# Altium PCB 48MHz1-4_TCXO.PcbDoc
Units mm, origin at the board's own origin, x right, y up, seen from the top; angles counter-clockwise.
Board outline 22.61 x 32.9 mm, 2 copper layers (Top Layer, Bottom Layer), stack 0.478 mm thick; 50 components, 24 nets, 162 pads, 215 vias.
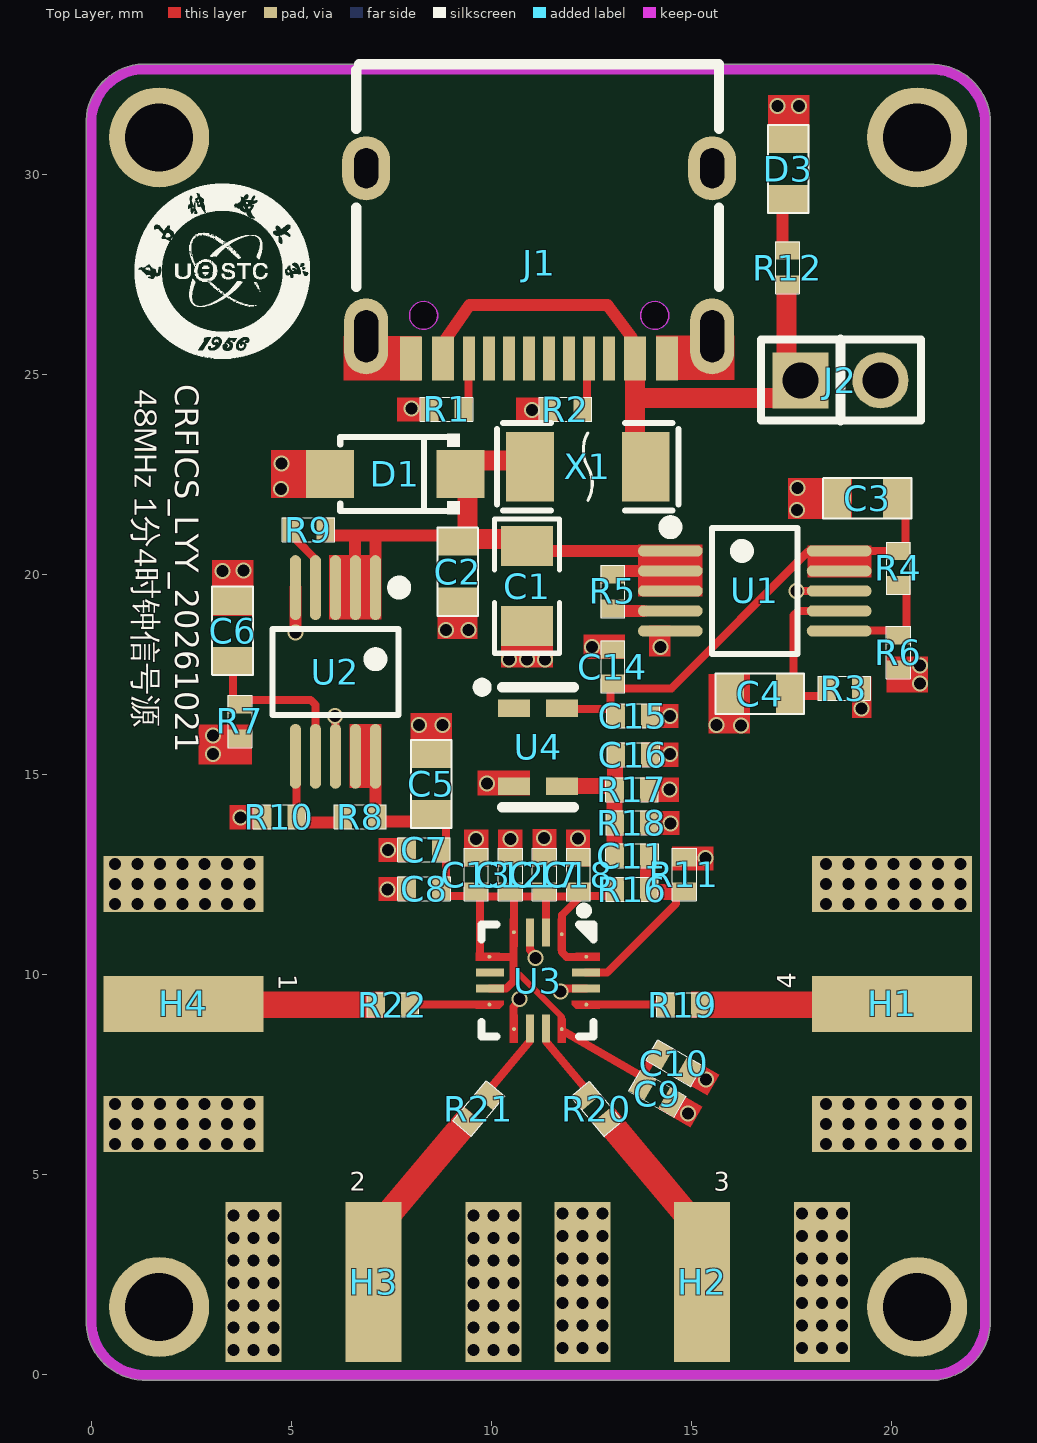
[diagram p0: Top Layer view]
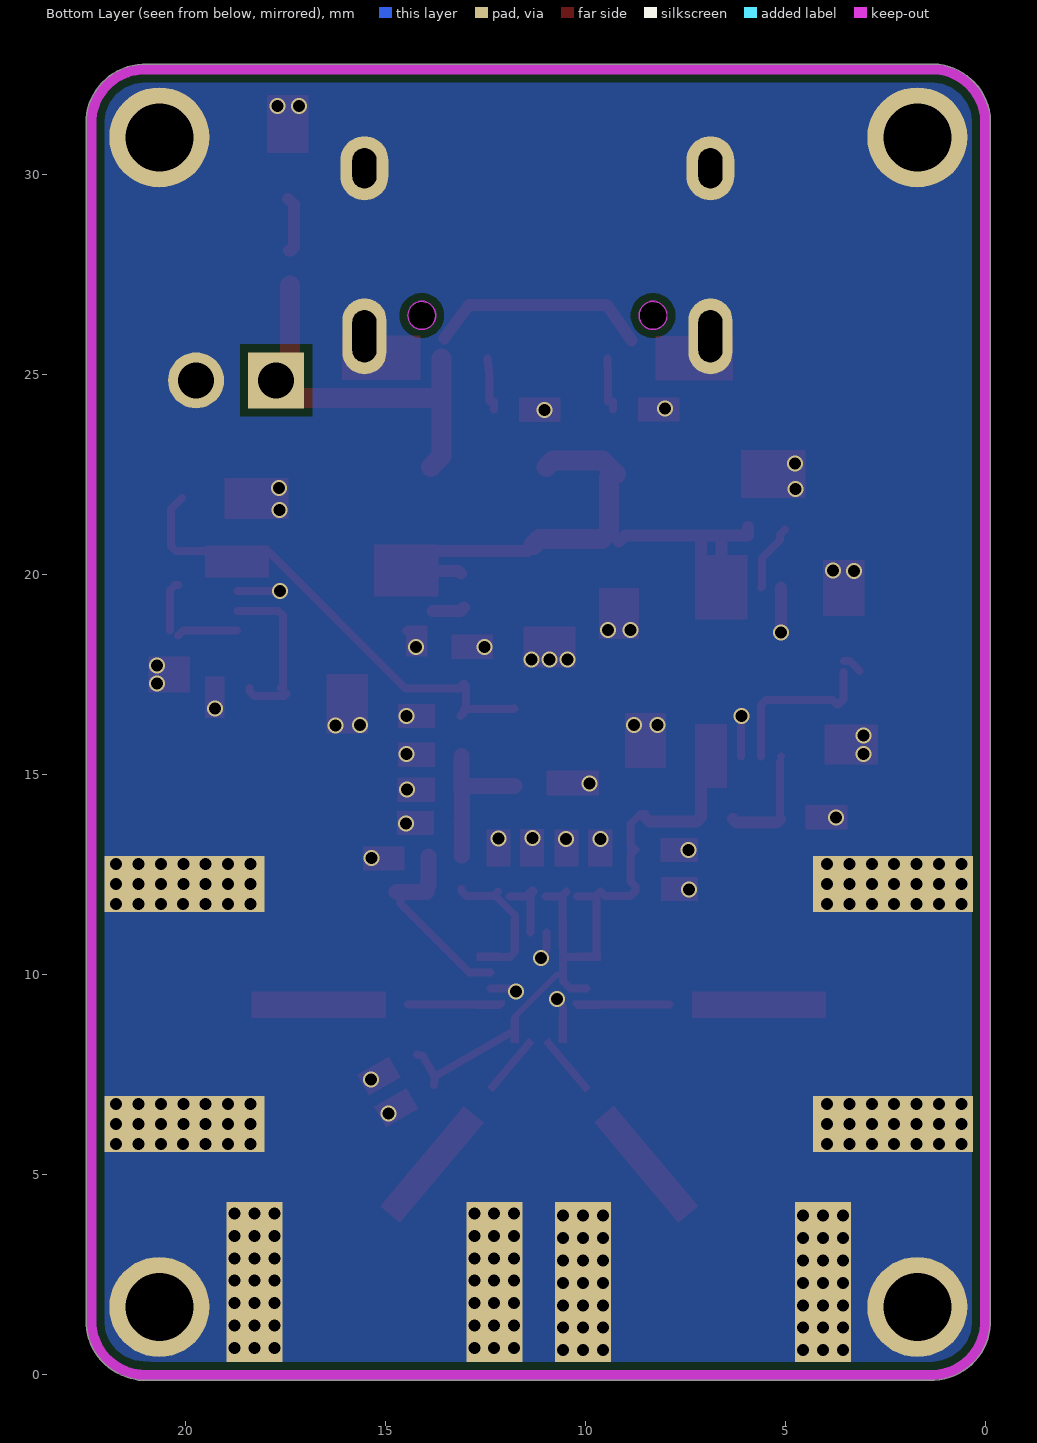
[diagram p1: Bottom Layer view, seen from below]

## Layer stack, top to bottom
Top Solder: solder mask 0.0102, Solder Resist, Dk 3.5
Top Layer: signal copper 0.0356
Dielectric 1: core 0.4064, Core-034, Dk 4.8
Bottom Layer: signal copper 0.0356
Bottom Solder: solder mask 0.0102, Solder Resist, Dk 3.5

## Board outline
1.273,-0.129 cw(c1.348,1.344) -0.127,1.399 -0.127,1.412 -0.127,31.345 -0.129,31.373 cw(c1.344,31.299) 1.419,32.773 1.452,32.766 21.047,32.766 21.08,32.769 cw(c21.006,31.296) 22.482,31.296 22.479,31.217 22.479,1.277 22.478,1.258 cw(c21.005,1.349) 21.246,-0.107 21.177,-0.127

## Design rules (kind name [scope] priority, off if disabled: settings)
Clearance Clearance_1 [InNamedPolygon('NONET_L-01_P-TOP')] p1: gap=0.58 ignorepadtopadclearanceinfootprint=FALSE except(0: Arc-Text Arc-Hole Track-Text Track-Hole SMDPad-Text SMDPad-Hole THPad-Text THPad-Hole Via-Text Via-Hole Fill-Text Fill-Hole Poly-Text Poly-Hole Region-Text Region-Hole Text-Text Text-Hole; 0.4: Arc-Arc Arc-Track Arc-SMDPad Arc-THPad Arc-Via Track-Track Track-SMDPad Track-THPad Track-Via SMDPad-SMDPad SMDPad-THPad SMDPad-Via THPad-THPad THPad-Via Via-Via; 0.7: Arc-Fill Arc-Poly Arc-Region Track-Fill Track-Poly Track-Region)
Clearance Clearance_2 [InNamedPolygon('NONET_L-01_P-002')] p2: gap=0.7 ignorepadtopadclearanceinfootprint=FALSE except(0: Arc-Hole Track-Hole SMDPad-Hole THPad-Hole Via-Hole Fill-Hole Poly-Hole Region-Hole Text-Hole; 0.3: Arc-Via Track-Via SMDPad-Via THPad-Via Via-Via)
Clearance GND_Bottom [InNamedPolygon('GND_Bottom')] p3: gap=0.6 ignorepadtopadclearanceinfootprint=TRUE
Clearance Ch341_3V3 [InNamedPolygon('CH341_3V3')] p4: gap=0.5 ignorepadtopadclearanceinfootprint=TRUE
Clearance VSS [InNamedPolygon('VSS')] p5: gap=0.2 ignorepadtopadclearanceinfootprint=TRUE except(0.6: Arc-Fill Arc-Poly Arc-Region Track-Fill Track-Poly Track-Region Fill-Fill Fill-Poly Fill-Region Poly-Poly Poly-Region Region-Region)
Clearance GND [InNamedPolygon('GND_Ploy')] p6: gap=0.4 ignorepadtopadclearanceinfootprint=TRUE except(0.8: Arc-Fill Arc-Poly Arc-Region Track-Fill Track-Poly Track-Region Fill-Fill Fill-Poly Fill-Region Poly-Poly Poly-Region Region-Region)
Clearance DC_GND [InNamedPolygon('DC_Ploy')] p7: gap=0.4 ignorepadtopadclearanceinfootprint=TRUE except(0.8: Arc-Fill Arc-Poly Arc-Region Track-Fill Track-Poly Track-Region Fill-Fill Fill-Poly Fill-Region Poly-Poly Poly-Region Region-Region)
Clearance LNA [InNamedPolygon('LNA')] p8: gap=0.102 ignorepadtopadclearanceinfootprint=TRUE except(0.2: Arc-Arc Arc-Track Track-Track SMDPad-Fill SMDPad-Poly SMDPad-Region THPad-Fill THPad-Poly THPad-Region; 0.8: Arc-Fill Arc-Poly Arc-Region Track-Fill Track-Poly Track-Region Via-Fill Via-Poly Via-Region Fill-Fill Fill-Poly Fill-Region Poly-Poly Poly-Region Region-Region)
Clearance Ploy [InPolygon] p9: gap=0.2 ignorepadtopadclearanceinfootprint=TRUE
Clearance Diff [InNetClass('Diff')] p10: gap=0.152 ignorepadtopadclearanceinfootprint=TRUE
Clearance [All] p11: gap=0.1 ignorepadtopadclearanceinfootprint=TRUE except(0.102: SMDPad-SMDPad; 0.203: SMDPad-THPad)
ComponentClearance [All] p1: gap=0.1 collisioncheckmode=3 verticalgap=0.1 showdistances=FALSE donotcheckwithout3dbody=TRUE
DiffPairsRouting [All] p1: maxlimit=10 minlimit=0.1 mostfreqgap=0.178 toplayer_minwidth=0.128 toplayer_maxwidth=1.016 toplayer_prefwidth=0.422 bottomlayer_minwidth=0.128 bottomlayer_maxwidth=1.016 bottomlayer_prefwidth=0.422 maxuncoupledlength=12.7
HoleSize [All] p1: absolutevalues=TRUE maxlimit=5 minlimit=0.025 maxpercent=80.000 minpercent=20.000
HoleToHoleClearance [All] p1: gap=0 allowstackedmicrovias=TRUE
MatchedLengths MatchedLengths_1 [InNetClass('class1')] p1: tolerance=25.4 checknetsindiffpair=FALSE checkdiffpairvsdiffpair=TRUE checkxsignals=TRUE checkothers=TRUE
MatchedLengths [InNetClass('DRM')] p2: tolerance=1.27 checknetsindiffpair=FALSE checkdiffpairvsdiffpair=TRUE checkxsignals=TRUE checkothers=TRUE
MinimumSolderMaskSliver [All] p1: minsoldermaskwidth=0
PlaneConnect [All] p1: planeconnectstyle=Direct reliefexpansion=0.508 reliefentries=4 reliefconductorwidth=0.254 reliefairgap=0.254
PolygonConnect [All] p1: connectstyle=Direct reliefconductorwidth=0.254 reliefentries=4 polygonreliefangle="90 Angle" airgapwidth=0.254
RoutingVias [All] p1: holewidth=0.711 width=1.27 viastyle="Through Hole" minholewidth=0.2 minwidth=0.1 maxholewidth=2.4 maxwidth=5
SilkToSilkClearance [All] p1: silktosilkclearance=0
SilkToSolderMaskClearance [IsPad] p1: minsilkscreentomaskgap=0 clearancetoexposedcopper=TRUE
SolderMaskExpansion [IsVia] p1: expansion=0.102 istentingtop=TRUE
SupplyNets "Schematic Supply Nets_1" [InNet('GND')] p1: voltage=0.000
SupplyNets "Schematic Supply Nets" [InNet('VDD')] p2: voltage=0.000
Width [All] p1: maxlimit=5 minlimit=0.1 preferedwidth=0.1 bottomlayer_maxwidth=0.254 minimp=50.000000 maximp=50.000000 favimp=50.000000
22 further rules are at their usual default settings.

## Classes and differential pairs
net class "New Class": NetH1_1 NetH2_1 NetH3_1 NetH4_1
net class class1: CLKOUT1 CLKOUT2 CLKOUT3 CLKOUT4
component class U_POWER: C1 C2 C3 C4 C5 C6 D1 D3 J1 J2 R1 R2 R3 R4 R5 R6 R7 R8 R9 R12 U1 U2 X1
component class U_48MHz_TCXO: C7 C8 C9 C10 C11 C12 C13 C14 C15 C16 C17 C18 H1 H2 H3 H4 m R12 R16 R17 R18 R19 R20 R21 R22 U3 U4

## Components (designator, comment, footprint, x,y, rotation, side; value= is the part's Value field where it differs from the comment)
C1 "47uF" 0805C 10.895,19.72 r90 top value="20pF  NP0"
C2 "10uF" 0603_Z 9.144,20.067 r270 top value="20pF  NP0"
C3 "4.7uF" 0603_Z 19.416,21.901 r0 top value="20pF  NP0"
C4 "4.7uF" 0603_Z 16.704,17.041 r180 top value="20pF  NP0"
C5 "4.7uF" 0603_Z 8.488,14.764 r270 top value="20pF  NP0"
C6 "4.7uF" 0603_Z 3.546,18.619 r90 top value="20pF  NP0"
C7 "1uF" 0402_Z 8.311,13.137 r0 top value="20pF  NP0"
C8 "10nF" 0402_Z 8.329,12.154 r180 top value="20pF  NP0"
C9 "10nF" 0402_Z 14.16,7.023 r150 top value="20pF  NP0"
C10 "1uF" 0402_Z 14.572,7.806 r330 top value="20pF  NP0"
C11 "100nF" 0402_Z 13.508,12.989 r0 top value="20pF  NP0"
C12 "10nF" 0402_Z 10.469,12.502 r90 top value="20pF  NP0"
C13 "1uF" 0402_Z 9.617,12.502 r90 top value="20pF  NP0"
C14 "10uF" 0402_Z 13.03,17.7 r90 top value="20pF  NP0"
C15 "100nF" 0402_Z 13.554,16.471 r180 top value="20pF  NP0"
C16 "10pF" 0402_Z 13.554,15.502 r180 top value="20pF  NP0"
C17 "10nF" 0402_Z 11.332,12.52 r270 top value="20pF  NP0"
C18 "1uF" 0402_Z 12.183,12.52 r270 top value="20pF  NP0"
D1 "SMF5.0A" SMF5.0A 7.602,22.524 r180 top
D3 "LED0" 0603_Z 17.414,30.14 r270 top
H1 "SMA" SMA-SMD 19.772,9.384 r180 top
H2 "SMA" SMA-SMD 15.166,2.077 r270 top
H3 "SMA" SMA-SMD 7.166,2.582 r90 top
H4 "SMA" SMA-SMD 2.558,9.168 r0 top
J1 "typec_16pin" TYPEC_16PIN 11.07,28.681 r180 top
J2 "2pin" H2-2mm 18.731,24.864 r0 top
R1 "5.1k" 0402_Z 8.876,24.145 r0 top
R2 "5.1k" 0402_Z 11.846,24.145 r0 top
R3 "33k" 0402_Z 18.826,17.164 r180 top
R4 "91k" 0402_Z 20.184,20.178 r270 top
R5 "200k" 0402_Z 13.03,19.579 r90 top
R6 "10k" 0402_Z 20.184,18.072 r270 top
R7 "33k" 0402_Z 3.703,16.33 r90 top
R8 "91k" 0402_Z 6.731,13.949 r180 top
R9 "200k" 0402_Z 5.42,21.139 r0 top
R10 "10k" 0402_Z 4.714,13.949 r180 top
R11 "10k" 0402_Z 14.814,12.502 r90 top
R12 "10k" 0402_Z 17.414,27.69 r270 top
R16 "10k" 0402_Z 13.51,12.154 r0 top
R17 "10k" 0402_Z 13.508,14.638 r0 top
R18 "50" 0402_Z 13.508,13.813 r0 top
R19 "33" 0402_Z 14.783,9.266 r0 top
R20 "33" 0402_Z 12.634,6.665 r310 top
R21 "33" 0402_Z 9.695,6.665 r230 top
R22 "33" 0402_Z 7.549,9.254 r180 top
U1 "IBSP3030ADJMS10R00" IBSP3030ADJMS10R00 16.588,19.601 r270 top
U2 "IBSP3030ADJMS10R00" IBSP3030ADJMS10R00 6.105,17.575 r180 top
U3 "5PB1214CMGK" 5PB1214CMGK 11.166,9.857 r270 top
U4 "YSO510TP" 48MH温补晶振 11.296,15.692 r270 top
X1 "Fuse" F1206 12.414,22.705 r0 top

## Footprints (in the part's own frame and the unit in brackets; to place one, negate y for a bottom-side part, rotate by r counter-clockwise, add the part's x,y. Pads: shape width x height; smd on the part's side, far side on the other; paste and mask are expansions set on the pad)
5PB1214CMGK [mm]
  round 0.098 smd: 1(-1.162,0.598) 4(-1.212,-0.598) 5(-0.598,-1.212) 8(0.598,-1.212) 9(1.212,-0.598) 12(1.212,0.598) 13(0.598,1.212) 16(-0.598,1.212)
  rect 0.7x0.2 smd mask+0.05: 2(-1.2,0.2) 3(-1.2,-0.2) 10(1.2,-0.2) 11(1.2,0.2)
  rect 0.2x0.7 smd mask+0.05: 6(-0.2,-1.2) 7(0.2,-1.2) 14(0.2,1.2) 15(-0.2,1.2)
  Top Layer region: 0.85,-0.5 1.55,-0.5 1.55,-0.7 1.05,-0.7 0.95,-0.7 0.85,-0.6 0.85,-0.5
  Top Layer region: 0.85,0.5 0.85,0.6 0.95,0.7 1.55,0.7 1.55,0.5 0.85,0.5
  Top Layer region: -0.85,-0.5 -0.85,-0.6 -0.95,-0.7 -1.55,-0.7 -1.55,-0.5 -0.85,-0.5
  Top Layer region: -0.75,0.5 -1.55,0.5 -1.55,0.7 -1.05,0.7 -0.85,0.7 -0.75,0.6 -0.75,0.5
  Top Layer region: 0.5,1.55 0.5,0.9 0.5,0.85 0.6,0.85 0.7,0.95 0.7,1.55 0.5,1.55
  Top Layer region: -0.5,-1.55 -0.5,-0.9 -0.5,-0.85 -0.6,-0.85 -0.7,-0.95 -0.7,-1.55 -0.5,-1.55
  Top Layer region: -0.5,1.55 -0.5,0.9 -0.5,0.85 -0.6,0.85 -0.7,0.95 -0.7,1.55 -0.5,1.55
  Top Layer region: 0.5,-1.55 0.5,-0.9 0.5,-0.85 0.6,-0.85 0.7,-0.95 0.7,-1.55 0.5,-1.55
  silkscreen extent -1.85,-1.4 1.4,1.4
48MH温补晶振 [mil] "YSO510TP 48MHZ 3.3V ±1.5PPM -30~85℃ (±0.5PPM) Clipped Sine Wave"
  rect 17.3x31.5 smd: 1(-38.4,-28.6) 2(38.4,-28.6) 3(38.4,18.7) 4(-38.4,18.7)
  silkscreen extent -64,-65 59,31
0402_Z [mm]
  rect 0.45x0.6 smd mask+0: 1(0.434,-0.006) 2(-0.416,-0.006)
  silkscreen extent -0.64,-0.31 0.66,0.29, body extent -0.41,-0.31 0.44,0.29, height 0.25
0603_Z [mm]
  rect 0.7x1 smd mask+0: 1(0.735,0.013) 2(-0.765,0.013)
  silkscreen extent -1.12,-0.49 1.09,0.52
0805C [mm]
  rect 1x1.3 smd: 1(-1,0) 2(1,0)
  silkscreen extent -1.68,-0.81 1.68,0.81
F1206 [mm] "保险丝"
  rect 1.19x1.728 smd paste+0 mask+0.051: 1(-1.445,0) 2(1.445,0)
  silkscreen extent -2.27,-1.09 2.27,1.09
H2-2mm [mm]
  rect 1.4x1.4 hole 0.9: 1(-1,0)
  round 1.4 hole 0.9: 2(1,0)
  silkscreen extent -1.99,-1 2.02,1.03
IBSP3030ADJMS10R00 [mm]
  oval 0.28x1.62 smd: 1(-1,-2.11) 2(-0.5,-2.11) 3(0,-2.11) 4(0.5,-2.11) 5(1,-2.11) 6(1,2.11) 7(0.5,2.11) 8(0,2.11) 9(-0.5,2.11) 10(-1,2.11)
  silkscreen extent -1.74,-2.26 1.58,1.07
SMA-SMD [mm]
  rect 4x1.4 smd mask+0: 1(-0.253,0.108) 2(-0.253,3.105) 2(-0.253,-2.889)
  rect 4x1.4 smd far side mask+0: 4(-0.253,3.105) 5(-0.253,-2.889)
SMF5.0A [mm]
  rect 1.2x1.2 smd: 1(-1.635,0) 2(1.635,0)
  silkscreen extent -1.6,-1 1.38,1
TYPEC_16PIN [mm]
  oval 1.2x1.6 hole 0.6 slot 1 at 90 deg paste-2539.97 mask+0.05: 13(-4.452,-1.486) 14(4.198,-1.486)
  oval 1.1x1.9 hole 0.6 slot 1.3 at 90 deg paste-2539.97 mask+0.05: 13(-4.452,2.714) 14(4.198,2.714)
  rect 0.55x1.1 smd paste+0 mask+0.05: A1B12(-3.327,3.264) A4B9(-2.527,3.264) B1A12(3.073,3.264) B4A9(2.273,3.264)
  rect 0.3x1.1 smd paste+0 mask+0.05: A5(-1.377,3.264) A6(-0.377,3.264) A7(0.123,3.264) A8(1.123,3.264) B5(1.623,3.264) B6(0.623,3.264) B7(-0.877,3.264) B8(-1.877,3.264)
  Keep-Out Layer board cut-out: 3.113,2.194 3.113,2.124 3.06,1.996 2.961,1.897 2.833,1.844 2.694,1.844 2.565,1.897 2.466,1.996 2.413,2.124 2.413,2.194 2.413,2.264 2.466,2.392 2.565,2.491 2.694,2.544 2.833,2.544 2.961,2.491 3.06,2.392 3.113,2.264 3.113,2.194 3.113,2.194
  Keep-Out Layer board cut-out: -2.667,2.194 -2.667,2.124 -2.72,1.996 -2.819,1.897 -2.947,1.844 -3.087,1.844 -3.215,1.897 -3.314,1.996 -3.367,2.124 -3.367,2.194 -3.367,2.264 -3.314,2.392 -3.215,2.491 -3.087,2.544 -2.947,2.544 -2.819,2.491 -2.72,2.392 -2.667,2.264 -2.667,2.194 -2.667,2.194
  Keep-Out Layer circle w0.003: c2.763,2.194 r0.35
  Keep-Out Layer circle w0.003: c-3.017,2.194 r0.35
  Keep-Out Layer region: 3.113,2.194 3.104,2.116 3.078,2.042 3.037,1.976 2.981,1.92 2.915,1.879 2.841,1.853 2.763,1.844 2.685,1.853 2.611,1.879 2.545,1.92 2.489,1.976 2.448,2.042 2.422,2.116 2.413,2.194 2.422,2.272 2.448,2.346 2.489,2.412 2.545,2.468 2.611,2.509 2.685,2.535 2.763,2.544 2.841,2.535 2.915,2.509 2.981,2.468 3.037,2.412 3.078,2.346 3.104,2.272 3.113,2.194
  Keep-Out Layer region: 3.113,2.194 3.113,2.124 3.06,1.996 2.961,1.897 2.833,1.844 2.694,1.844 2.565,1.897 2.466,1.996 2.413,2.124 2.413,2.194 2.413,2.264 2.466,2.392 2.565,2.491 2.694,2.544 2.833,2.544 2.961,2.491 3.06,2.392 3.113,2.264 3.113,2.194 3.113,2.194
  Keep-Out Layer region: -2.667,2.194 -2.676,2.116 -2.702,2.042 -2.743,1.976 -2.799,1.92 -2.865,1.879 -2.939,1.853 -3.017,1.844 -3.095,1.853 -3.169,1.879 -3.235,1.92 -3.291,1.976 -3.332,2.042 -3.358,2.116 -3.367,2.194 -3.358,2.272 -3.332,2.346 -3.291,2.412 -3.235,2.468 -3.169,2.509 -3.095,2.535 -3.017,2.544 -2.939,2.535 -2.865,2.509 -2.799,2.468 -2.743,2.412 -2.702,2.346 -2.676,2.272 -2.667,2.194
  Keep-Out Layer region: -2.667,2.194 -2.667,2.124 -2.72,1.996 -2.819,1.897 -2.947,1.844 -3.087,1.844 -3.215,1.897 -3.314,1.996 -3.367,2.124 -3.367,2.194 -3.367,2.264 -3.314,2.392 -3.215,2.491 -3.087,2.544 -2.947,2.544 -2.819,2.491 -2.72,2.392 -2.667,2.264 -2.667,2.194 -2.667,2.194
  silkscreen extent -4.63,-4.09 4.45,1.49

## Part data
C1: library part CAP, "0805"
C2 C14: library part CAP, "0603"
C3 C4 C5 C6 C7 C8 C9 C10 C11 C12 C13 C15 C16 C17 C18: library part CAP, "0402"
D3: "Typical INFRARED GaAs LED", LatestRevisionDate=08-Jul-2005, LatestRevisionNote="Mech Layer 1 removed.", PackageDescription="LED; 2 Leads", PackageReference=LED-0, Published=8-Jun-2000, Publisher="Altium Limited"
H1 H2 H3 H4: "BWSMA-KE-P001"
R1 R2 R3 R4 R5 R6 R7 R8 R9 R10 R11 R12 R16 R17 R18 R19 R20 R21 R22: library part Res3, "Resistor", LatestRevisionDate=04-Mar-2005, LatestRevisionNote="PCB Footprint replaced.", PackageReference=J1-0603, Published=8-Jun-2000, Publisher="Altium Limited"
U3: library part 5PB1214CMGK8
U4: library part 48MHz温补晶振, "48MHz温补晶振"
X1: CURRENT=1, RESISTANCE=1m, SimulationGenericComponent=True

## Free pads (board coordinates)
  round 2.5 hole 1.7 mask+0.102: ""(1.7,1.7) ""(1.7,30.94) ""(20.65,1.7) ""(20.65,30.94)

## Via types
v1: diameter 0.4, hole 0.3, Top Layer to Bottom Layer, 168 vias
v2: diameter 0.4, hole 0.3, Top Layer to Bottom Layer, tented both sides, 47 vias

## Nets (pads, with @x,y where several pads share a name; then routed paths per layer and width w, separated by ;. In a path a pad name is that pad's centre, name@x,y a point inside that pad or via, vN(x,y) a via of type N, cw(c..) or ccw(c..) an arc to the next point about the centre after c; other vN are vias at no path point)
CLKOUT1: R19.2 U3.13 | length 2.1
  Top Layer w0.2: U3.13 R19.2@14.439,9.26
CLKOUT2: R20.2 U3.11
CLKOUT3: R21.2 U3.10
CLKOUT4: R22.2 U3.8 | length 2.1
  Top Layer w0.2: R22.2@7.893,9.26 U3.8
GND: C1.1 C2.1 C3.2 C4.1 C5.2 C6.1 C7.2 C8.1 C9.2 C10.1 C12.1 C13.1 C14.1 C15.2 C16.2 C17.2 C18.2 D1.2 D3.2 H1.2 H1.4 H1.5 H2.2 H2.4 H2.5 H3.2 H3.4 H3.5 H4.2 H4.4 H4.5 J1.13 J1.14 J1.A1B12 J1.B1A12 J2.2 pad. R1.2 R2.2 R3.2 R6.1 R7.2 R10.1 R11.1 R17.1 R18.1 U1.5 U1.8 U2.5 U2.8 U3.3 U3.9 U3.14 U4.2 | length 5.9
  Top Layer w0.2: v2(6.1,16.474) 6.105,16.135 U2.8 ; U3.9@10.559,8.655 10.559,9.204 10.704,9.348 v2(10.704,9.402) ; U3.3 10.966,10.623 11.106,10.483 v2(11.106,10.429) ; v2(11.733,9.591) 11.787,9.591 11.854,9.657 U3.14 ; v2@14.224,18.288 14.224,18.601 U1.5 ; v2(17.635,19.595) 17.639,19.598 18.695,19.598 U1.8
  Top Layer w0.3: v2@5.08,18.542 v2(5.105,18.567) U2.5
  other v1: 3.561,0.622 4.061,0.622 9.555,0.622 10.055,0.622 4.56,0.623 10.554,0.623 11.778,0.676 12.277,0.677 12.777,0.677 17.772,0.676 18.271,0.677 18.771,0.677 3.561,1.182 4.061,1.182 4.56,1.183 9.555,1.182 10.055,1.182 10.554,1.183 11.778,1.236 12.277,1.237 12.777,1.237 17.772,1.236 18.271,1.237 18.771,1.237 3.561,1.742 4.061,1.742 4.56,1.743 9.555,1.742 10.055,1.742 10.554,1.743 11.778,1.796 12.277,1.797 12.777,1.797 17.772,1.796 18.271,1.797 18.771,1.797 3.561,2.302 4.061,2.302 4.56,2.303 9.555,2.302 10.055,2.302 10.554,2.303 11.778,2.356 12.277,2.357 12.777,2.357 17.772,2.356 18.271,2.357 18.771,2.357 3.561,2.862 4.061,2.862 4.56,2.863 9.555,2.862 10.055,2.862 10.554,2.863 11.778,2.916 12.277,2.917 12.777,2.917 17.772,2.916 18.271,2.917 18.771,2.917 3.561,3.422 4.061,3.422 4.56,3.423 9.555,3.422 10.055,3.422 10.554,3.423 11.778,3.476 12.277,3.477 12.777,3.477 17.772,3.476 18.271,3.477 18.771,3.477 3.561,3.982 4.061,3.982 4.56,3.983 9.555,3.982 10.055,3.982 10.554,3.983 11.778,4.036 12.277,4.037 12.777,4.037 17.772,4.036 18.271,4.037 18.771,4.037 0.599,5.78 1.159,5.78 1.719,5.78 2.279,5.78 2.839,5.78 3.399,5.78 3.959,5.78 18.372,5.779 18.932,5.779 19.492,5.779 20.052,5.779 20.612,5.779 21.172,5.779 21.732,5.779 0.598,6.279 1.158,6.279 1.718,6.279 2.278,6.279 2.838,6.279 3.398,6.279 3.958,6.279 18.372,6.279 18.932,6.279 19.492,6.279 20.052,6.279 20.612,6.279 21.172,6.279 21.732,6.279 0.598,6.779 1.158,6.779 1.718,6.779 2.278,6.779 2.838,6.779 3.398,6.779 3.958,6.779 18.371,6.778 18.931,6.778 19.491,6.778 20.051,6.778 20.611,6.778 21.171,6.778 21.731,6.778 0.599,11.774 1.159,11.774 1.719,11.774 2.279,11.774 2.839,11.774 3.399,11.774 3.959,11.774 18.372,11.773 18.932,11.773 19.492,11.773 20.052,11.773 20.612,11.773 21.172,11.773 21.732,11.773 0.598,12.273 1.158,12.273 1.718,12.273 2.278,12.273 2.838,12.273 3.398,12.273 3.958,12.273 18.372,12.273 18.932,12.273 19.492,12.273 20.052,12.273 20.612,12.273 21.172,12.273 21.732,12.273 0.598,12.773 1.158,12.773 1.718,12.773 2.278,12.773 2.838,12.773 3.398,12.773 3.958,12.773 18.371,12.772 18.931,12.772 19.491,12.772 20.051,12.772 20.611,12.772 21.171,12.772 21.731,12.772
  other v2: 14.915,6.536 15.363,7.382 7.41,12.14 15.351,12.926 7.425,13.122 9.616,13.401 10.482,13.401 11.323,13.418 12.165,13.409 14.48,13.781 3.73,13.935 14.462,14.636 9.894,14.789 3.043,15.518 14.465,15.518 3.043,15.989 16.249,16.237 8.195,16.254 8.786,16.254 15.635,16.248 14.469,16.475 19.263,16.667 20.714,17.285 20.714,17.739 10.45,17.886 10.899,17.886 11.344,17.886 12.516,18.202 14.228,18.205 8.874,18.621 9.432,18.627 3.28,20.102 3.812,20.109 17.648,21.625 4.743,22.152 17.661,22.177 4.752,22.787 11.015,24.123 8.008,24.159 17.153,31.721 17.696,31.73
NetC3_1: C3.1 C14.2 C15.1 R4.2 U1.9 U1.10 U4.4 | length 12.3
  Top Layer w0.2: U4.4 11.793,16.645 13.035,16.645 13.036,16.561 C15.1 ; C15.1@12.983,16.613 C14.2@12.983,17.231 ; C14.2 13.155,17.165 14.501,17.165 17.922,20.586 18.683,20.586 U1.10 18.702,20.598 20.089,20.598 20.175,20.598 R4.2 20.235,20.594 20.36,20.719 20.36,21.655 C3.1@20.089,21.926
NetC4_2: C4.2 R3.1 U1.7 | length 4.3
  Top Layer w0.2: C4.2@17.56,17.17 17.56,18.984 17.677,19.101 U1.7 ; C4.2@17.615,17.174 C4.2 17.527,16.97 18.267,16.97 18.392,17.095 R3.1
NetC6_2: C6.2 R7.1 U2.7 | length 4.7
  Top Layer w0.2: C6.2@3.149,17.604 3.399,17.854 C6.2 ; C6.2@3.549,17.575 3.549,16.889 3.674,16.764 R7.1 3.817,16.872 5.487,16.872 5.605,16.755 U2.7
NetC11_1: C11.1 R11.2 R16.1 U3.15 | length 5.1
  Top Layer w0.2: U3.15 12.894,10.057 14.619,11.783 14.619,11.961 14.744,12.086 R11.2
  Top Layer w0.4: C11.1@13.917,12.958 13.919,12.956 13.919,12.248 13.97,12.198 13.97,12.072 R11.2@14.719,12.072
NetC11_2: C11.2 C16.1 R17.2 R18.2 U4.3 | length 3.9
  Top Layer w0.4: U4.3@11.777,14.722 13.067,14.722 13.092,14.697 R17.2 ; C11.2 13.088,12.987 13.088,13.803 R18.2 13.087,13.812 13.087,14.628 R17.2 ; C16.1@13.095,15.479 13.095,15.407 13.092,15.404 R17.2
NetD3_1: D3.1 R12.2 | length 1.4
  Top Layer w0.3: R12.2 17.362,28.106 17.287,28.181 17.287,29.265 D3.1
NetH1_1: H1.1 R19.1
NetH2_1: H2.1 R20.1
NetH3_1: H3.1 R21.1
NetH4_1: H4.1 R22.1
NetJ1_A4B9: J1.A4B9 J1.B4A9 J2.1 R12.1 X1.2 | length 15.3
  Top Layer w0.3: J1.B4A9@8.846,25.868 9.455,26.751 12.902,26.751 J1.A4B9@13.524,25.916
  Top Layer w0.5: J1.A4B9 13.592,25.412 13.592,24.42 ; X1.2 13.592,22.972 13.592,24.42 ; R12.1@17.385,27.231 17.385,25.314 17.775,24.924 17.775,24.914 17.281,24.42 13.592,24.42
NetJ1_A5: J1.A5 R2.1 | length 1.3
  Top Layer w0.2: R2.1 R2.1@12.289,24.34 ; R2.1@12.398,24.334 12.398,24.967 J1.A5
NetJ1_B5: J1.B5 R1.1 | length 1.3
  Top Layer w0.2: R1.1 R1.1@9.312,24.34 ; R1.1@9.432,24.334 9.432,24.967 J1.B5
NetR4_1: R4.1 R6.2 U1.6 | length 2.8
  Top Layer w0.2: U1.6@18.709,18.612 20.055,18.612 R6.2 ; R4.1 20.254,19.744 20.379,19.619 20.379,19.504 20.382,19.502 R6.2@20.382,18.617
NetR5_2: R5.2 U1.4 | length 0.8
  Top Layer w0.3: R5.2@13.036,19.185 13.122,19.099 U1.4@13.818,19.099
NetR8_1: R8.1 R10.2 U2.6 | length 2.6
  Top Layer w0.2: U2.6 U2.6@5.111,15.458 ; R10.2@5.13,14.039 U2.6@5.13,15.328
  Top Layer w0.3: R10.2@5.136,13.905 5.136,13.882 5.205,13.814 6.222,13.814 6.31,13.903 R8.1@6.31,13.905
NetR9_2: R9.2 U2.4 | length 1.7
  Top Layer w0.2: R9.2 5.129,21.008 5.129,20.875 5.589,20.415 5.589,19.7 U2.4
VBUS: C1.2 C2.2 D1.1 R5.1 R9.1 U1.1 U1.2 U1.3 U2.1 U2.2 U2.3 X1.1 | length 15.9
  Top Layer w0.3: R9.1@5.929,21.194 5.929,20.986 7.1,20.986 ; U2.2@6.598,19.699 6.598,20.811 ; U2.1 7.105,20.982 7.1,20.986 ; C2.2 9.003,20.986 7.1,20.986 ; C1.2@11.296,20.754 11.449,20.601 U1.1 ; R5.1@13.111,20.035 13.177,20.101 U1.2
  Top Layer w0.5: D1.1 9.574,22.861 10.813,22.861 X1.1 ; D1.1@9.411,22.445 9.411,21.08 9.483,21.008 9.589,20.902 11.149,20.902 C1.2@11.296,20.754
VDD: C5.1 C7.1 C8.2 C9.1 C10.2 C12.2 C13.2 C17.1 C18.1 R8.2 R16.2 U2.9 U2.10 U3.1 U3.2 U3.4 U3.5 U3.7 U3.12 U3.16 | length 22.4
  Top Layer w0.15: 10.58,10.016 10.705,10.016 11.773,8.948 U3.12@11.773,8.646
  Top Layer w0.2: C5.1 8.615,14.029 8.865,13.779 8.865,13.252 C7.1 C7.1@8.862,13.014 ; C7.1@8.862,12.95 C7.1@8.862,13.014 ; C7.1@8.862,13.217 C7.1@8.862,13.014 ; 9.72,10.487 9.72,11.989 C13.2 9.508,11.972 8.87,11.972 8.745,12.097 C8.2 8.745,12.212 8.87,12.337 8.87,12.475 8.872,12.476 8.872,13.005 C7.1@8.862,13.014 ; C13.2@9.744,11.965 C12.2@10.213,11.965 ; U3.5 10.561,10.455 ; U3.7 10.372,9.657 10.543,9.829 10.561,9.847 10.561,10.016 10.561,10.455 ; C12.2 10.584,11.977 10.595,11.965 10.993,11.965 ; U3.4@10.561,11.062 10.561,10.455 ; U3.4 C12.2@10.568,11.961 ; U3.2 C17.1@11.366,11.961 ; C17.1@11.454,11.958 C18.1@11.895,11.958 ; U3.1 11.764,11.494 C18.1@12.212,11.942 ; U3.1@11.766,11.045 11.766,10.57 11.88,10.455 U3.16 ; U3.12@11.773,8.61 C9.1@13.723,7.484 ; C18.1 12.292,11.972 12.97,11.972 13.095,12.097 R16.2 ; C9.1 13.759,7.443 14.063,7.97 C10.2
  Top Layer w0.25: C17.1 C17.1@11.422,11.99
  Top Layer w0.3: U2.10@7.105,15.317 7.105,13.949 7.222,13.832 8.392,13.832 C5.1@8.503,13.943
pads on no net: J1.A6 J1.A7 J1.A8 J1.B6 J1.B7 J1.B8 U3.6 U4.1

## Polygon pours and split planes (outlines as drawn)
GND on Bottom Layer "GND_L02_P000" (solid, remove dead copper, pour order 0): 0.635,32.639 21.717,32.639 22.606,31.75 22.479,31.623 22.479,0.635 22.352,0.635 21.463,-0.254 21.336,-0.127 0.127,-0.127 0.127,0.635 -0.254,1.016 -0.127,1.143 -0.127,31.877

## Keep-outs
Keep-Out Layer:
  lines w0.254: -0.002,31.367 cw(c1.344,31.299) 1.412,32.646 ; 0,1.412 0,31.367 ; 0.001,1.412 ccw(c1.348,1.344) 1.28,-0.002 ; 1.24,32.639 21.074,32.639 ; 1.28,0 21.177,0 ; 20.938,0.002 ccw(c21.005,1.349) 22.352,1.281 ; 21.074,32.642 cw(c21.006,31.296) 22.352,31.228 22.352,1.277

## Other copper
Top Layer:
  region net GND: 6.107,21.92 6.107,23.13 4.496,23.13 4.496,21.92
  region net GND: 4.054,20.376 3.021,20.376 3.021,18.971 4.054,18.971
  region net GND: 9.014,16.544 7.981,16.544 7.981,15.177 9.014,15.177
  region net GND: 16.467,17.519 15.433,17.519 15.433,16.035 16.467,16.035
  rectangle net GND: 19.019,16.426 19.509,17.465
  region net GND: 19.025,21.393 19.025,22.426 17.415,22.426 17.415,21.393
  rectangle net GND: 16.922,30.551 17.955,32.002
  region net GND: 9.658,18.401 9.658,19.679 8.654,19.679 8.654,18.401
  region net GND: 11.549,17.683 11.549,18.716 10.245,18.716 10.245,17.683
  region net GND: 20.917,17.061 20.917,17.964 19.878,17.964 19.878,17.061
  region net GND: 13.349,17.905 13.349,18.509 12.31,18.509 12.31,17.905
  region net GND: 4.024,16.257 2.683,16.257 2.683,15.263 4.024,15.263
  region net GND: 4.49,13.64 4.49,14.244 3.451,14.244 3.451,13.64
  region net GND: 8.683,23.835 8.683,24.439 7.644,24.439 7.644,23.835
  region net GND: 11.664,23.827 11.664,24.431 10.625,24.431 10.625,23.827
  region net GND: 15.557,12.612 15.557,13.216 14.518,13.216 14.518,12.612
  region net GND: 10.974,14.483 10.974,15.113 9.656,15.113 9.656,14.483
  region net GND: 14.482,18.733 13.948,18.733 13.948,17.966 14.482,17.966
  region net GND: 8.245,24.866 8.245,25.979 6.309,25.979 6.309,24.866
  region net GND: 16.088,24.869 16.088,25.982 14.123,25.982 14.123,24.869
  region net NetH1_1: 18.351,9.582 14.989,9.582 14.989,8.921 18.351,8.921
  region net NetH4_1: 7.334,9.581 3.979,9.581 3.979,8.92 7.334,8.92
  region net NetH2_1: 15.14,4.219 13.036,6.727 12.529,6.302 14.634,3.794
  region net NetH3_1: 7.673,3.796 9.791,6.32 9.285,6.745 7.167,4.221
  region net CLKOUT2: 12.462,7.194 11.419,8.437 11.265,8.308 12.308,7.065
  region net CLKOUT3: 10.008,7.048 11.066,8.308 10.912,8.436 9.855,7.177
  region net VDD: 7.261,16.279 6.459,16.279 6.459,14.668 7.261,14.668
  region net NetC3_1: 19.512,19.932 19.512,20.733 17.902,20.733 17.902,19.932
  region net VBUS: 15.282,19.456 15.282,20.763 13.672,20.763 13.672,19.456
  rectangle net VBUS: 5.947,18.891 7.254,20.501
  region net GND: 9.329,12.718 9.921,12.718 9.921,13.634 9.329,13.634
  region net GND: 10.178,12.714 10.77,12.714 10.77,13.631 10.178,13.631
  region net GND: 11.034,12.721 11.626,12.721 11.626,13.638 11.034,13.638
  region net GND: 11.876,12.718 12.468,12.718 12.468,13.634 11.876,13.634
  region net GND: 14.678,16.177 14.678,16.769 13.761,16.769 13.761,16.177
  region net GND: 14.681,15.21 14.681,15.802 13.764,15.801 13.764,15.21
  region net GND: 14.686,14.333 14.686,14.925 13.769,14.925 13.769,14.333
  region net GND: 14.703,13.505 14.703,14.097 13.787,14.097 13.787,13.505
  region net GND: 8.11,12.83 8.11,13.422 7.193,13.422 7.193,12.83
  region net GND: 8.105,11.85 8.105,12.442 7.188,12.442 7.188,11.85
  region net GND: 14.477,7.167 14.181,6.654 14.975,6.196 15.271,6.708
  region net GND: 14.909,7.959 14.613,7.447 15.407,6.988 15.703,7.501

## Silkscreen, mask and mechanical layers (free items; w line width, h text height)
Top Overlay:
  drawing of 37 lines, arcs and shapes, not listed
  text "CRFICS_LYY_20261021" at 1.905,24.765 h1 r270
  text "48MHz 1分4时钟信号源" at 0.889,24.638 h1 r270
  text "1" at 4.527,10.015 h0.8 r270
  text "4" at 17.778,9.66 h0.8 r90
  text "2" at 6.467,4.444 h0.8
  text "3" at 15.558,4.444 h0.8

## Dimensions
0,1.412 to 22.352,1.281 on Top Overlay
1.28,0 to 1.24,32.639 on Top Overlay